# Altium PCB PCB.PcbDoc (part 3 of 3)
Units mm, origin at the board's own origin, x right, y up, seen from the top; angles counter-clockwise.
Board outline 35.13 x 75.01 mm, 4 copper layers (Top Layer, GND_Signal_1, Signal_1, Bottom Layer), stack 1.707 mm thick; 130 components, 99 nets, 648 pads, 871 vias.
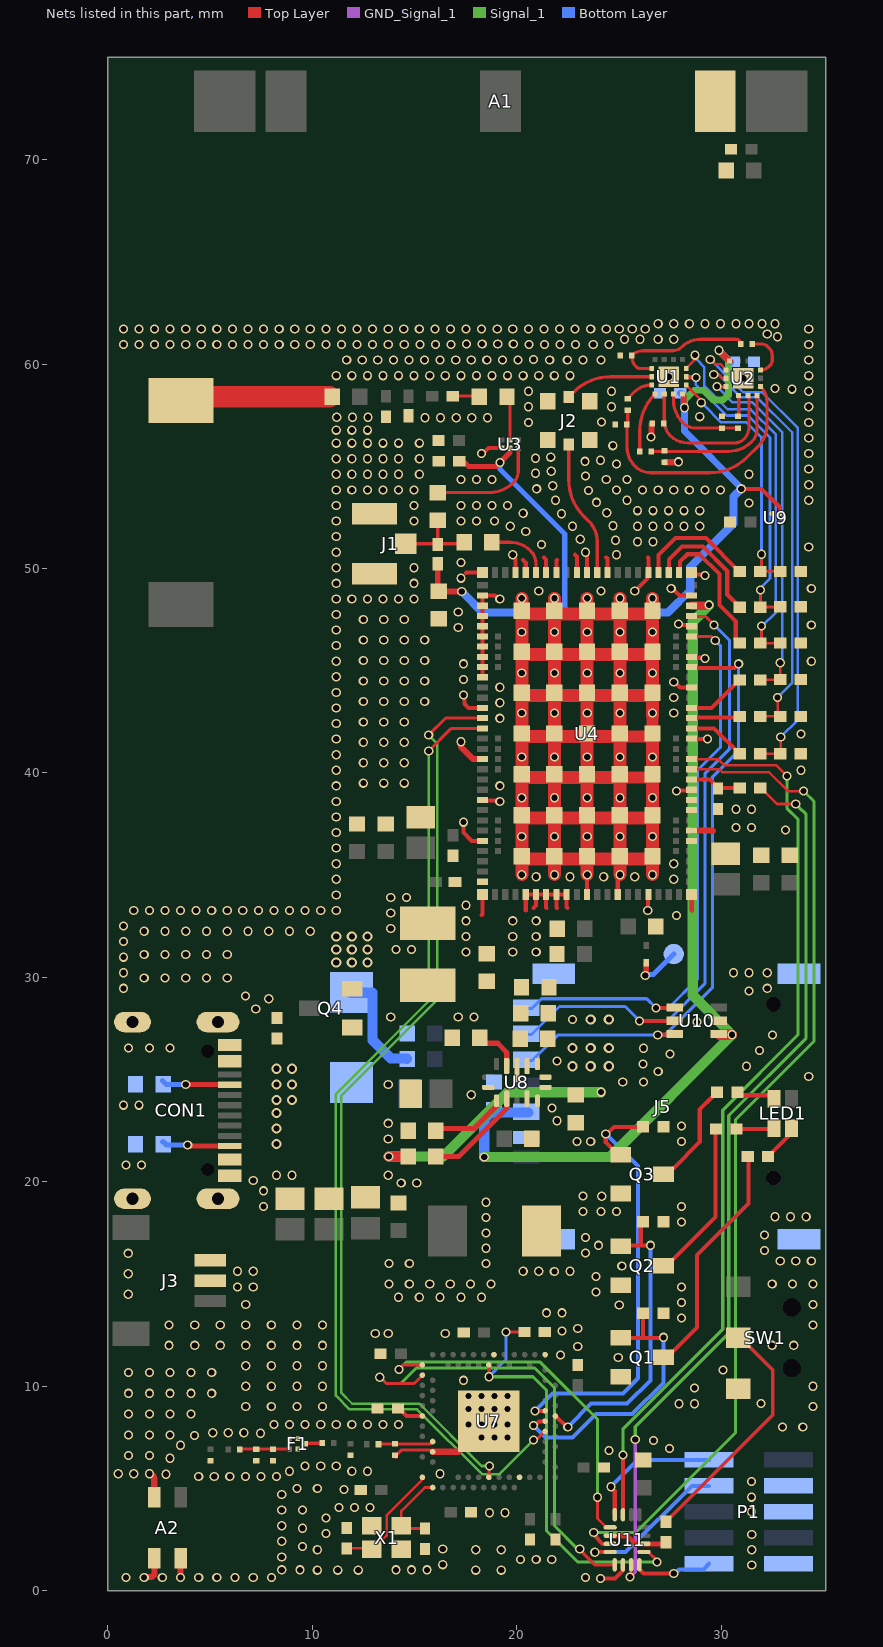
[diagram p4: the nets of this part, all layers, seen from the top]

## Via types
v1: diameter 0.45, hole 0.3, Top Layer to Bottom Layer, tented both sides, 821 vias
v2: diameter 0.5, hole 0.3, Top Layer to Bottom Layer, tented both sides, 26 vias
v3: diameter 0.45, hole 0.3, Top Layer to Bottom Layer, 24 vias

## Nets (pads, with @x,y where several pads share a name; then routed paths per layer and width w, separated by ;. In a path a pad name is that pad's centre, name@x,y a point inside that pad or via, vN(x,y) a via of type N, cw(c..) or ccw(c..) an arc to the next point about the centre after c; other vN are vias at no path point) (continued)
GND: A2.2 C5.2 C6.2 C7.2 C9.2 C10.1 C11.1 C14.2 C15.2 C16.2 C17.2 C18.2 C19.2 C20.2 C21.2 C22.2 C23.2 C26.2 C27.2 C28.2 C29.2 C30.2 C31.2 C32.2 C33.1 C34.1 C35.1 C36.1 C37.2 C38.2 C40.2 C41.2 C42.2 C44.1 C45.2 C46.2 C48.1 C49.1 C50.1 C51.1 C52.1 C53.1 C57.1 C58.1 C59.1 C60.2 CON1.A1 CON1.A12 CON1.B1 CON1.B12 CON1.S1 CON1.S2 CON1.S3 CON1.S4 CR1.1 F1.2 F1.3 F1.5 J1.2 J2.2 J3.1 J3.2 J5.C5 J5.S1 J5.S2 J5.S3 J5.S4 L2.1 L3.1 L4.1 L5.1 L8.1 P1.3 P1.5 P1.9 Q1.2 Q2.2 Q3.2 R3.1 R7.1 R8.1 R9.1 R14.1 R15.1 R16.1 R22.1 R23.1 R24.1 R26.1 R29.1 R30.1 R31.1 R32.2 R33.2 R34.1 SW1.1 U1.15 U2.15 U3.1 U3.4 U4.1 U4.5 U4.6 U4.7 U4.8 U4.9 U4.11 U4.14 U4.17 U4.21 U4.27 U4.31 U4.36 U4.41 U4.44 U4.47 U4.50 U4.52 U4.56 U4.60 U4.62 U4.63 U4.65 U4.66 U4.68 U4.69 U4.72 U4.74 U4.75 U4.76 U4.77 U4.78 U4.79 U4.80 U4.81 U4.82 U4.85 U4.90 U4.94 U4.98 U4.103 U7.74 U7.AD2 U7.B7 U7.F23 U8.1 U8.7 U8.12 U8.14 U9.B1 U10.2 U11.6 X1.2 X1.4 | length 161.4
  Top Layer w0.145: C33.1@14.087,6.513 14.087,6.594 14.38,6.887 U7.F23@15.797,6.887
  Top Layer w0.146: U7.F23@15.797,6.887 U7.F23@15.891,6.793 ; C60.2@26.162,6.415 C60.2@26.187,6.39
  Top Layer w0.2: A2.2@2.269,4.576 A2.2@2.284,4.576 ; v1(17.399,37.592) 17.399,37.084 17.803,36.68 U4.98@18.324,36.68 ; v1(17.399,43.815) 17.447,43.767 17.447,43.386 17.653,43.18 U4.85@18.324,43.18 ; 17.526,49.784 17.542,49.8 U4.72@18.324,49.8 ; 18.288,33.045 18.324,33.082 U4.1@18.324,34.06 ; v1(18.288,55.626) 18.356,55.626 18.617,55.887 U3.1@19.276,55.887 ; U4.94@18.324,38.68 18.36,38.644 19.141,38.644 v1(19.177,38.608) ; U4.82@18.324,44.68 U4.76@18.324,47.68 U4.75@18.324,48.18 U4.74@18.324,48.68 18.944,48.68 19.109,48.514 v1(19.177,48.514) ; v1(19.812,50.673) 19.812,50.605 19.944,50.473 U4.69@19.944,49.8 ; 20.32,50.419 20.444,50.295 U4.68@20.444,49.8 ; 20.447,33.274 20.444,33.277 U4.5@20.444,34.06 U4.6@20.944,34.06 ; 20.828,33.401 20.944,33.517 U4.6@20.944,34.06 ; 21.336,50.546 21.444,50.438 U4.66@21.444,49.8 ; 21.463,33.401 21.444,33.42 U4.7@21.444,34.06 ; U4.65@21.944,49.8 21.944,50.392 21.971,50.419 ; 21.971,33.401 21.944,33.428 U4.8@21.944,34.06 ; 22.479,33.401 22.444,33.436 U4.9@22.444,34.06 U4.8@21.944,34.06 ; 22.86,50.673 22.944,50.589 U4.63@22.944,49.8 ; v1(23.368,50.8) 23.444,50.724 U4.62@23.444,49.8 ; U4.11@23.444,34.06 23.448,34.064 23.448,35.019 v1(23.452,35.023) ; v1(24.105,0.589) 24.814,0.589 25.2,0.975 U11.6@25.2,1.264 ; 24.384,50.546 24.444,50.486 U4.60@24.444,49.8 ; U4.14@24.944,34.06 24.944,34.848 25.052,34.956 v1(25.052,35.023) ; v1(25.781,48.895) 26.394,49.508 26.394,49.75 U4.56@26.444,49.8 26.444,50.518 26.416,50.546 ; v1(26.416,33.274) 26.43,33.288 26.43,34.046 U4.17@26.444,34.06 ; v1(27.559,49.022) 27.617,49.022 27.959,48.68 U4.50@28.564,48.68 ; v1(27.686,44.45) 27.724,44.45 27.994,44.18 U4.41@28.564,44.18 ; v1(27.813,39.116) 27.845,39.148 28.532,39.148 U4.31@28.564,39.18 ; v1(27.913,47.28) 27.981,47.28 28.031,47.23 28.514,47.23 U4.47@28.564,47.18 ; U4.21@28.564,34.06 28.564,33.285 28.575,33.274 ; U4.36@28.564,41.68 28.576,41.668 29.325,41.668 v1(29.337,41.656) ; U4.44@28.564,45.68 28.608,45.636 29.167,45.636 v1(29.21,45.593) ; U4.52@28.564,49.8 28.659,49.705 29.162,49.705 v1(29.21,49.657) ; U4.6@20.944,34.06 U4.7@21.444,34.06 ; U4.7@21.444,34.06 U4.8@21.944,34.06
  Top Layer w0.3: v1(1.778,0.635) 1.807,0.664 2.139,0.664 2.286,0.811 2.286,1.559 A2.2@2.269,1.576 ; v1(2.032,5.715) cw(c2.032,5.478) 2.269,5.478 A2.2@2.269,4.576 ; v1(3.556,0.635) 3.556,1.576 A2.2@3.569,1.576 ; U7.F23@15.891,6.793 17.141,6.793 U7.74@18.641,8.293 ; v1(17.272,41.529) 17.272,41.275 17.867,40.68 U4.90@18.324,40.68 ; v1(26.568,56.439) 26.597,56.467 26.597,57.071 C7.2@26.63,57.103 ; L4.1@27.229,55.189 27.24,55.2 27.895,55.2 v1(27.915,55.22) ; U4.27@28.564,37.18 29.579,37.18 29.591,37.168
  Top Layer w0.508: U4.103@20.217,39.785 U4.103@20.252,39.785 ; U4.103@20.252,37.785 U4.103@20.252,37.903
  Top Layer w0.584: U4.103@25.052,39.785 U4.103@26.652,39.785 ; U4.103@25.052,41.785 U4.103@26.652,41.785
  Top Layer w0.597: U4.103@26.652,41.785 v1@26.652,42.785
  Top Layer w0.635: v1(20.252,35.023) U4.103@20.252,35.785 ; v1(20.252,48.547) U4.103@20.252,47.785 ; v1(21.852,35.023) U4.103@21.852,35.785 ; v1(21.852,48.547) U4.103@21.852,47.785 ; v1(23.452,35.023) U4.103@23.452,35.785 ; v1(23.452,48.547) U4.103@23.452,47.785 ; v1(25.052,35.023) U4.103@25.052,35.785 ; v1(25.052,48.547) U4.103@25.052,47.785 ; v1(26.652,35.023) U4.103@26.652,35.785 ; U4.103@26.652,41.785 26.652,39.785 U4.103@26.652,37.785 ; v1@26.652,42.785 U4.103@26.652,43.785 ; v1(26.652,48.547) U4.103@26.652,47.785 ; U4.103@20.252,35.785 U4.103@21.852,35.785 ; U4.103@20.252,35.785 U4.103@20.252,37.785 ; U4.103@20.252,37.785 U4.103@20.252,39.785 ; U4.103@20.252,37.785 U4.103@21.852,37.785 ; U4.103@20.252,39.785 v1(20.252,40.785) U4.103@20.252,41.785 ; U4.103@20.252,39.785 U4.103@21.852,39.785 ; U4.103@20.252,41.785 U4.103@20.252,43.785 ; U4.103@20.252,41.785 U4.103@21.852,41.785 ; U4.103@20.252,43.785 U4.103@20.252,45.785 ; U4.103@20.252,43.785 U4.103@21.852,43.785 ; U4.103@20.252,45.785 U4.103@20.252,47.785 ; U4.103@20.252,45.785 U4.103@21.852,45.785 ; U4.103@20.252,47.785 U4.103@21.852,47.785 ; U4.103@21.852,35.785 U4.103@23.452,35.785 ; U4.103@21.852,35.785 U4.103@21.852,37.785 ; U4.103@21.852,37.785 U4.103@23.452,37.785 ; U4.103@21.852,37.785 v1(21.852,38.785) U4.103@21.852,39.785 ; U4.103@21.852,39.785 v1(21.852,40.785) U4.103@21.852,41.785 ; U4.103@21.852,39.785 U4.103@23.452,39.785 ; U4.103@21.852,41.785 U4.103@23.452,41.785 ; U4.103@21.852,41.785 U4.103@21.852,43.785 ; U4.103@21.852,43.785 U4.103@21.852,45.785 ; U4.103@21.852,43.785 U4.103@23.452,43.785 ; U4.103@21.852,45.785 U4.103@23.452,45.785 ; U4.103@21.852,45.785 U4.103@21.852,47.785 ; U4.103@21.852,47.785 U4.103@23.452,47.785 ; U4.103@23.452,35.785 U4.103@25.052,35.785 ; U4.103@23.452,35.785 U4.103@23.452,37.785 ; U4.103@23.452,37.785 U4.103@23.452,39.785 ; U4.103@23.452,37.785 U4.103@25.052,37.785 ; U4.103@23.452,39.785 v1(23.452,40.785) U4.103@23.452,41.785 ; U4.103@23.452,39.785 U4.103@25.052,39.785 ; U4.103@23.452,41.785 U4.103@23.452,43.785 ; U4.103@23.452,41.785 U4.103@25.052,41.785 ; U4.103@23.452,43.785 U4.103@23.452,45.785 ; U4.103@23.452,43.785 U4.103@25.052,43.785 ; U4.103@23.452,45.785 U4.103@23.452,47.785 ; U4.103@23.452,45.785 U4.103@25.052,45.785 ; U4.103@23.452,47.785 U4.103@25.052,47.785 ; U4.103@25.052,35.785 U4.103@26.652,35.785 ; U4.103@25.052,35.785 U4.103@25.052,37.785 ; U4.103@25.052,37.785 U4.103@25.052,39.785 ; U4.103@25.052,37.785 U4.103@26.652,37.785 ; U4.103@25.052,39.785 v1(25.052,40.785) U4.103@25.052,41.785 ; U4.103@25.052,41.785 U4.103@25.052,43.785 ; U4.103@25.052,43.785 U4.103@25.052,45.785 ; U4.103@25.052,43.785 U4.103@26.652,43.785 ; U4.103@25.052,45.785 U4.103@25.052,47.785 ; U4.103@25.052,45.785 U4.103@26.652,45.785 ; U4.103@25.052,47.785 U4.103@26.652,47.785 ; U4.103@26.652,35.785 U4.103@26.652,37.785 ; U4.103@26.652,43.785 U4.103@26.652,45.785 ; U4.103@26.652,45.785 U4.103@26.652,47.785
  other v1: 0.889,0.635 2.667,0.635 4.445,0.635 5.334,0.635 6.223,0.635 7.112,0.635 8.001,0.635 23.368,0.635 8.509,1.016 9.398,1.016 10.25,1 11.25,1 12.25,1 14.097,1.016 14.859,1.016 15.621,1.016 18,1 19.25,1 16.383,1.27 31.5,1.25 20.193,1.524 20.955,1.524 21.717,1.524 8.509,1.651 10.25,2 18,2 19.25,2 31.5,2 16.383,2.032 9.525,2.159 8.509,2.413 31.5,2.75 10.668,2.794 9.525,3.048 8.509,3.175 10.668,3.556 18.669,3.81 19.431,3.81 31.494,3.855 8.509,3.937 9.525,3.937 11.303,4.064 12.065,4.064 12.827,4.064 31.496,4.572 8.509,4.699 11.557,4.953 9.25,5 10.25,5 31.496,5.334 4.445,5.588 5.207,5.588 5.969,5.588 6.731,5.588 7.493,5.588 8.255,5.588 2.845,5.69 0.508,5.715 1.27,5.715 16.256,5.715 8.89,5.842 11.938,5.842 12.7,5.842 9.652,6.096 10.414,6.096 11.176,6.096 3.048,6.477 1.016,6.604 2.032,6.604 24.511,6.858 27.483,6.96 3.556,7.112 26.695,7.341 4.242,7.595 1.016,7.62 2.032,7.62 3.048,7.62 7.468,7.696 5.131,7.722 5.893,7.722 6.655,7.722 33,8 34,8 8.128,8.128 8.89,8.128 9.652,8.128 10.414,8.128 11.176,8.128 11.938,8.128 12.7,8.128 13.462,8.128 14.224,8.128 1.016,8.636 2.032,8.636 3.048,8.636 4.064,8.636 6.75,9 8,9 9.25,9 10.5,9 34.5,9 27.94,9.144 28.702,9.144 31.953,9.153 1.016,9.652 2.032,9.652 3.048,9.652 4.064,9.652 5.08,9.652 28.702,9.906 6.75,10 8,10 9.25,10 10.5,10 34.5,10 17.399,10.287 1.016,10.668 2.032,10.668 3.048,10.668 4.064,10.668 5.08,10.668 30.099,10.795 6.75,11 8,11 9.25,11 10.5,11 24.97,11.41 22.141,11.527 22.987,11.938 3,12 4.25,12 5.5,12 6.75,12 8,12 9.25,12 10.5,12 32.5,12 33.554,12 13.081,12.573 13.716,12.573 16.51,12.573 22.225,12.7 22.987,12.827 3,13 4.25,13 5.5,13 6.75,13 8,13 9.25,13 10.5,13 34.5,13 28.067,13.335 21.463,13.589 22.225,13.589 25.019,13.97 6.75,14 34.5,14 28.067,14.097 14.224,14.351 15.24,14.351 16.256,14.351 17.272,14.351 18.288,14.351 1,14.5 23.876,14.605 6.35,14.859 7.112,14.859 28.067,14.859 13.75,15 14.75,15 15.75,15 16.75,15 17.75,15 18.75,15 32.5,15 33.5,15 34.5,15 23.876,15.367 1,15.5 6.35,15.621 7.112,15.621 20.32,15.621 21.082,15.621 21.844,15.617 22.606,15.621 25.146,15.875 13.75,16 14.75,16 18.5,16 32.893,16.129 33.655,16.129 34.417,16.129 1,16.5 23.368,16.51 32.131,16.637 18.5,16.75 24.003,16.891 23.368,17.272 32.131,17.399 18.5,17.5 28.067,18.034 18.5,18.25 32.639,18.288 33.401,18.288 34.163,18.288 23.241,18.542 24.13,18.542 24.892,18.542 7.62,18.796 28.067,18.796 18.5,19 23.241,19.304 24.166,19.292 7.62,19.558 14.351,19.939 15.113,19.939 7.112,20.066 8.255,20.32 9.017,20.32 13.716,20.32 0.889,20.828 1.651,20.828 22.956,21.971 23.622,21.971 28.067,21.971 13.716,22.098 28.067,22.733 13.716,22.86 21.971,22.987 21.736,23.61 0.762,23.749 1.524,23.749 17.78,24.257 13.716,24.765 25.19,24.88 26.206,24.88 34.29,25.146 26.924,25.4 31.242,25.654 26.179,25.762 21.971,25.908 27.5,26.25 31.877,26.416 1.016,26.543 2.032,26.543 3.048,26.543 26.206,26.531 32.512,27.178 28.829,27.813 22.733,27.94 13.843,28.067 17.145,28.067 17.907,28.067 7.239,28.448 7.874,28.956 6.731,29.083 31.369,29.337 0.762,29.464 32.258,29.464 1.778,29.972 2.794,29.972 3.81,29.972 4.826,29.972 5.842,29.972 0.762,30.226 30.607,30.226 31.369,30.226 32.258,30.226 0.762,30.988 1.778,31.115 2.794,31.115 3.81,31.115 4.826,31.115 5.842,31.115 17.526,31.242 19.812,31.242 20.955,31.242 14.097,31.369 14.859,31.369 0.762,31.75 17.526,32.004 19.812,32.004 20.955,32.004 1.778,32.258 2.794,32.258 3.81,32.258 4.826,32.258 5.842,32.258 6.858,32.258 7.874,32.258 8.89,32.258 9.906,32.258 13.843,32.385 0.762,32.512 17.526,32.766 19.812,32.766 20.955,32.766 27.813,33.02 13.843,33.147 1.27,33.274 2.032,33.274 2.794,33.274 3.556,33.274 4.318,33.274 5.08,33.274 5.842,33.274 6.604,33.274 7.366,33.274 8.128,33.274 8.89,33.274 9.652,33.274 10.414,33.274 11.176,33.274 17.526,33.528 13.843,33.909 14.605,33.909 11.176,34.036 11.176,34.798 27.686,34.798 20.955,34.925 22.606,34.925 24.257,34.925 25.781,34.925 11.176,35.56 27.686,35.56 11.176,36.322 20.252,36.897 21.852,36.897 23.452,36.897 25.052,36.897 26.652,36.897 11.176,37.084 33.147,37.211 30.734,37.338 31.496,37.338 11.176,37.846 30.734,38.227 31.496,38.227 11.176,38.608 20.252,38.785 23.452,38.785 25.052,38.785 26.652,38.785 11.176,39.37 19.177,39.37 12.5,39.5 13.5,39.5 14.5,39.5 11.176,40.132 33.909,40.132 12.5,40.5 13.5,40.5 14.5,40.5 26.652,40.785 11.176,40.894 12.5,41.5 13.5,41.5 14.5,41.5 11.176,41.656 33.909,41.91 11.176,42.418 12.5,42.5 13.5,42.5 14.5,42.5 19.177,42.672 27.686,42.926 20.252,42.934 21.852,42.934 23.452,42.934 25.052,42.934 26.652,42.934 11.176,43.18 19.177,43.434 12.5,43.5 13.5,43.5 14.5,43.5 15.5,43.5 27.686,43.688 11.176,43.942 19.177,44.196 12.5,44.5 13.5,44.5 14.5,44.5 15.5,44.5 17.399,44.577 11.176,44.704 20.252,44.89 21.852,44.89 23.452,44.89 25.052,44.89 26.652,44.89 17.399,45.339 11.176,45.466 34.417,45.466 12.5,45.5 13.5,45.5 14.5,45.5 15.5,45.5 11.176,46.228 12.5,46.5 13.5,46.5 14.5,46.5 15.5,46.5 20.252,46.903 21.852,46.903 23.452,46.903 25.052,46.903 26.652,46.903 11.176,46.99 17.145,47.117 34.417,47.244 12.5,47.5 13.5,47.5 14.5,47.5 11.176,47.752 17.145,47.879 11.176,48.514 11.938,48.514 12.7,48.514 13.462,48.514 14.224,48.514 14.986,48.514 21.082,48.895 24.13,48.895 34.417,49.022 11.176,49.276 14.986,49.276 17.272,49.53 11.176,50.038 14.986,50.038 17.272,50.292 24.892,50.673 11.176,50.8 34.29,51.054 21.209,51.181 25.908,51.308 26.67,51.308 24.841,51.384 23.114,51.435 11.176,51.562 20.447,51.816 19.685,52.07 22.733,52.07 25.908,52.07 26.67,52.07 27.432,52.07 28.194,52.07 28.956,52.07 24.714,52.095 11.176,52.324 14.986,52.324 17.272,52.324 18.034,52.324 18.923,52.324 22.2,52.68 20.32,52.705 24.409,52.73 25.908,52.832 26.67,52.832 27.432,52.832 28.194,52.832 28.956,52.832 11.176,53.086 14.986,53.086 17.272,53.086 18.034,53.086 18.796,53.086 19.558,53.086 31.369,53.213 23.901,53.238 21.895,53.34 25.4,53.34 34.29,53.34 23.52,53.823 11.176,53.848 11.938,53.848 12.7,53.848 13.462,53.848 14.224,53.848 14.986,53.848 24.892,53.848 26.162,53.848 26.924,53.848 27.686,53.848 28.448,53.848 29.21,53.848 29.972,53.848 20.98,53.899 21.768,54.051 34.29,54.102 17.272,54.356 18.034,54.356 18.796,54.356 24.384,54.356 25.4,54.356 23.368,54.534 11.176,54.61 11.938,54.61 12.7,54.61 13.462,54.61 14.224,54.61 15.24,54.61 31.369,54.61 20.93,54.661 21.692,54.762 34.29,54.864 24.892,55.118 23.343,55.245 24.105,55.296 11.176,55.372 11.938,55.372 12.7,55.372 13.462,55.372 14.224,55.372 15.24,55.372 20.93,55.397 21.666,55.448 34.29,55.626 24.705,56.011 11.176,56.134 11.938,56.134 12.7,56.134 13.462,56.134 14.224,56.134 15.24,56.134 34.29,56.388 11.176,56.769 11.938,56.769 12.7,56.769 20.574,57.15 34.29,57.15 24.155,57.175 15.519,57.379 16.281,57.379 17.043,57.379 17.805,57.379 18.567,57.379 11.201,57.404 11.963,57.404 12.725,57.404 28.956,57.429 20.574,57.912 24.638,57.912 34.29,57.912 20.574,58.674 24.638,58.674 34.29,58.674 33.477,58.776 32.639,58.801 31.087,59.311 27.448,59.38 11.176,59.436 11.938,59.436 12.7,59.436 13.462,59.436 14.224,59.436 14.986,59.436 15.748,59.436 16.51,59.436 17.272,59.436 18.034,59.436 18.796,59.436 19.558,59.436 20.32,59.436 21.082,59.436 21.844,59.436 22.606,59.436 34.29,59.436 11.684,60.198 12.446,60.198 13.208,60.198 13.97,60.198 14.732,60.198 15.494,60.198 16.256,60.198 17.018,60.198 17.78,60.198 18.542,60.198 19.304,60.198 20.066,60.198 21.615,60.198 22.479,60.198 23.241,60.198 24.13,60.198 34.29,60.198 20.828,60.223 0.762,60.96 1.524,60.96 2.286,60.96 3.048,60.96 3.81,60.96 4.572,60.96 5.334,60.96 6.096,60.96 6.858,60.96 7.62,60.96 8.382,60.96 9.144,60.96 9.906,60.96 10.668,60.96 11.43,60.96 12.192,60.96 12.954,60.96 13.716,60.96 14.503,60.96 15.265,60.96 16.027,60.96 16.789,60.96 20.599,60.96 21.361,60.96 22.123,60.96 22.885,60.96 23.749,60.96 24.511,60.96 34.29,60.96 17.551,60.985 18.313,60.985 19.075,60.985 19.837,60.985 25.273,61.214 26.035,61.214 26.924,61.214 27.686,61.214 32.766,61.341 32.258,61.468 0.762,61.722 1.524,61.722 2.286,61.722 3.048,61.722 3.81,61.722 4.572,61.722 5.334,61.722 6.096,61.722 6.858,61.722 7.62,61.722 8.382,61.722 9.144,61.722 9.906,61.722 10.668,61.722 11.43,61.722 12.192,61.722 12.954,61.722 13.716,61.722 14.478,61.722 15.24,61.722 16.002,61.722 16.764,61.722 17.526,61.722 18.288,61.722 19.05,61.722 19.812,61.722 20.574,61.722 21.336,61.722 22.098,61.722 22.86,61.722 23.622,61.722 24.384,61.722 25.019,61.722 25.654,61.722 26.289,61.722 34.29,61.722 26.924,61.976 27.686,61.976 28.448,61.976 29.21,61.976 29.972,61.976 30.734,61.976 31.369,61.976 32.004,61.976 32.639,61.976
  other v2: 22.733,25.654 23.622,25.654 24.511,25.654 22.733,26.543 23.622,26.543 24.511,26.543 23.622,27.94 24.511,27.94
  other v3: 18.288,7.493 18.923,7.493 19.558,7.493 17.653,8.128 18.288,8.128 18.923,8.128 19.558,8.128 17.653,8.89 18.288,8.89 18.923,8.89 19.558,8.89 17.653,9.525 18.288,9.525 18.923,9.525 19.558,9.525
GPS_LNA_IN: L6.1 U3.5 | length 2.2
  Top Layer w0.156: L6.1@19.527,58.408 cw(c19.167,58.049) 19.676,58.049 U3.5@19.676,56.287
GPS_RF1: C13.2 U3.3 | length 5.6
  Top Layer w0.156: C13.2@16.145,53.714 18.621,53.714 ccw(c18.621,55.471) 19.863,54.229 ccw(c19.349,54.743) 20.076,54.743 U3.3@20.076,55.887
GPS_RF2: C12.2 C13.1 J1.1 L9.2 | length 4
  Top Layer w0.156: J1.1@14.571,51.211 L9.2@16.145,51.211 ; L9.2@16.145,51.178 L9.2@16.145,51.211 ; C13.1@16.145,52.364 L9.2@16.145,51.211 ; C12.2@17.426,51.211 L9.2@16.145,51.211
GPS_RF3: C12.1 U4.67 | length 3.1
  Top Layer w0.156: C12.1@18.785,51.283 19.694,51.283 cw(c19.694,49.895) 20.676,50.876 cw(c20.027,50.228) 20.944,50.228 U4.67@20.944,49.8
ILIM: R31.2 U8.4 | length 2.3
  Top Layer w0.254: R31.2@18.201,27.051 18.478,26.774 19.073,26.774 19.515,26.332 U8.4@19.515,25.667
LTE_RF: J2.3 U1.13 | length 4
  Top Layer w0.156: J2.3@22.788,58.637 cw(c24.584,56.84) 24.584,59.38 U1.13@26.603,59.38
LTE_RF1: J2.1 U4.61 | length 6.7
  Top Layer w0.156: J2.1@22.547,56.075 22.547,54.35 ccw(c25.087,54.35) 23.291,52.554 23.546,52.299 cw(c22.584,51.337) 23.944,51.337 U4.61@23.944,49.8
NetA1_2: A1.2 C1.2 L1.2
NetANT1_1: ANT1.1 L7.1 | length 7.3
  Top Layer w1.041: ANT1.1@3.581,58.231 3.759,58.408 L7.1@10.85,58.408
NetC8_1: C8.1 L6.2 | length 1.2
  Top Layer w0.156: C8.1@16.87,58.434 L6.2@18.115,58.434
NetC23_1: C23.1 R13.2 U4.32 | length 2.6
  Top Layer w0.2: U4.32@28.564,39.68 29.45,39.68 29.845,39.285 C23.1@29.845,39.235 29.878,39.268 30.916,39.268 30.92,39.272 R13.2@30.945,39.272
NetC35_2: C35.2 CR1.2 F1.4 R18.1 | length 2.5
  Top Layer w0.156: R18.1@6.457,6.909 6.457,6.934 F1.4@8.842,6.934 ; F1.4@8.846,6.938 F1.4@8.842,6.934 ; F1.4@8.892,6.934 F1.4@8.842,6.934
NetC37_1: C37.1 U7.N24 | length 1.4
  Top Layer w0.2: C37.1@14.355,9.055 14.355,8.801 14.613,8.543 U7.N24@15.391,8.543
NetC44_2: C44.2 C45.1 C46.1 C48.2 C49.2 D2.2 Q4.2 R25.2 U8.3 | length 5.4
  Bottom Layer w0.5: D2.2@11.913,29.251 12.954,29.251 12.954,26.924 13.843,26.035 14.641,26.035 R25.2@14.641,26.01
  other v2: 11.176,30.734 11.938,30.734 12.7,30.734 11.176,31.369 11.938,31.369 12.7,31.369 11.176,32.004 11.938,32.004 12.7,32.004
NetCON1_A5: CON1.A5 R32.1 | length 3.4
  Top Layer w0.25: v1(3.81,24.765) 3.82,24.755 5.944,24.755 CON1.A5@5.954,24.745
  Bottom Layer w0.25: R32.1@2.682,24.943 2.859,24.765 v1(3.81,24.765)
NetCON1_B5: CON1.B5 R33.1 | length 3.4
  Top Layer w0.25: v1(3.907,21.802) 3.963,21.745 CON1.B5@5.954,21.745
  Bottom Layer w0.25: R33.1@2.682,21.946 2.707,21.971 2.876,21.802 v1(3.907,21.802)
NetD1_1: D1.1 TP1.1 | length 2.5
  Top Layer w0.254: v1(26.289,30.099) 26.289,30.152 26.338,30.201 26.338,30.718 D1.1@26.34,30.72
  Bottom Layer w0.254: v1(26.289,30.099) 26.327,30.137 26.682,30.137 TP1.1@27.686,31.14
NetF1_1: F1.1 L12.2 | length 0.9
  Top Layer w0.156: F1.1@9.646,7.163 9.646,7.187 9.673,7.214 L12.2@10.485,7.214
NetFB1_2: FB1.2 R2.2 U4.102
NetLED1_1: LED1.1 R20.2 | length 1.9
  Top Layer w0.2: R20.2@32.301,21.234 33.445,22.379 LED1.1@33.445,22.618
NetLED1_2: LED1.2 R19.2 | length 1.9
  Top Layer w0.2: R19.2@30.751,22.581 32.558,22.581 LED1.2@32.595,22.618
NetLED1_3: LED1.3 R21.2 | length 1.9
  Top Layer w0.2: R21.2@30.802,24.384 30.827,24.384 30.98,24.232 32.431,24.232 LED1.3@32.595,24.068
NetQ1_3: Q1.3 R20.1 | length 12
  Top Layer w0.2: Q1.3@27.19,11.41 27.317,11.41 27.598,11.691 27.643,11.691 28.829,12.878 28.829,16.408 31.349,18.929 31.349,21.059 31.101,21.059 31.276,21.234 R20.1@31.301,21.234
NetQ2_3: Q2.3 R19.1 | length 7.9
  Top Layer w0.2: Q2.3@27.19,15.896 27.317,15.896 27.598,16.177 27.632,16.177 29.726,18.271 29.726,22.581 R19.1@29.751,22.581
NetQ3_3: Q3.3 R21.1 | length 5.2
  Top Layer w0.2: Q3.3@27.19,20.377 27.317,20.377 27.598,20.658 27.668,20.658 28.956,21.946 28.956,23.538 29.602,24.184 29.602,24.209 29.777,24.384 R21.1@29.802,24.384
NetR4_2: R4.2 U4.55 | length 5.9
  Top Layer w0.2: U4.55@26.944,49.8 26.944,50.668 27.762,51.486 29.261,51.486 30.886,49.86 R4.2@30.92,49.86
NetR5_2: R5.2 U4.54 | length 6.3
  Top Layer w0.2: U4.54@27.444,49.8 27.444,50.431 28.092,51.079 29.108,51.079 30.302,49.886 30.302,48.725 R5.2@30.92,48.108
NetR6_2: R6.2 U4.53 | length 6.8
  Top Layer w0.2: U4.53@27.944,49.8 27.994,49.85 27.994,50.346 28.346,50.698 28.956,50.698 29.914,49.74 29.914,48.22 30.72,47.414 30.72,46.53 30.895,46.355 R6.2@30.92,46.355
NetR13_1: R13.1 U11.7 | length 44.4
  Top Layer w0.125: R13.1@31.92,39.268 31.953,39.268 32.741,38.481 v1(33.655,38.481)
  Top Layer w0.152: v1(25.552,0.66) 25.587,0.695 25.587,1.251 U11.7@25.6,1.264
  GND_Signal_1 w0.152: v1(25.552,0.66) 25.801,0.909 v1(25.801,7.386)
  Signal_1 w0.152: v1(25.801,7.386) 25.801,8.021 30.378,12.598 30.378,23.241 34.163,27.026 34.163,37.973 33.782,38.354 33.782,38.481 v1(33.655,38.481)
NetR35_1: R35.1 SW1.2 | length 11.9
  Top Layer w0.178: R35.1@27.305,3.37 32.537,8.603 32.537,10.786 30.952,12.371 SW1.2@30.852,12.371
NetR35_2: R35.2 U11.2 U11.10 | length 2.9
  Top Layer w0.25: U11.2@24.575,2.689 24.579,2.685 25.407,2.685 25.803,2.289 U11.10@26.225,2.289 26.228,2.286 27.145,2.286 R35.2@27.28,2.421
NetU4_33: U4.33 U11.3 | length 49.2
  Top Layer w0.125: U4.33@28.564,40.18 29.924,40.18 30.068,40.036 32.354,40.036 33.274,39.116 v1(34.036,39.116)
  Top Layer w0.2: v1(23.774,2.845) 23.774,2.718 24.205,2.288 U11.3@24.575,2.289 U11.3@24.575,2.289
  Signal_1 w0.152: v1(23.774,2.845) 25.832,2.845 30.709,7.722 30.709,23.038 34.544,26.873 34.544,38.608 v1(34.036,39.116)
NetU4_34: U4.34 U11.15 | length 44.9
  Top Layer w0.125: U4.34@28.564,40.68 29.855,40.68 30.149,40.386 32.69,40.386 v1(33.22,39.856)
  Top Layer w0.2: v1(25.198,6.629) 25.198,3.716 U11.15@25.2,3.714
  Signal_1 w0.152: v1(25.198,6.629) 25.198,7.901 30.082,12.785 30.082,23.504 33.764,27.185 33.764,37.737 33.22,38.281 v1(33.22,39.856)
nRF52_ANT: C33.2 L13.1 U7.H23 | length 2.7
  Top Layer w0.156: L13.1@13.239,7.177 15.774,7.177 U7.H23@15.891,7.293
nRF52_RST: C41.1 U7.AC13 U11.9 | length 21
  Top Layer w0.152: U7.AC13@18.641,11.043 18.642,11.042 18.642,10.466 v1(18.644,10.465) ; v1(19.482,12.649) C41.1@20.379,12.649 ; U11.9@26.225,1.889 26.44,1.889 26.797,1.532 v1@26.797,1.397 ; v1@26.797,1.372 26.848,1.372 v1(26.873,1.397)
  Signal_1 w0.152: v1(18.644,10.465) 20.803,10.465 21.463,9.804 21.463,2.921 22.987,1.397 v1(26.873,1.397)
  Bottom Layer w0.152: v1(18.644,10.465) 19.482,11.303 v1(19.482,12.649)
nRF52_SWDCLK: U7.AA24 U11.5 | length 22.3
  Top Layer w0.152: v1(13.301,10.439) 13.606,10.135 14.983,10.135 U7.AA24@15.391,10.543 ; v1@23.038,2.045 23.819,1.264 U11.5@24.8,1.264
  Signal_1 w0.152: v1(13.301,10.439) 13.332,10.439 13.637,10.135 14.326,10.135 15.082,10.891 20.881,10.891 21.852,9.919 21.852,3.167 22.918,2.101 v1@23.089,2.101
  other v1: 23.089,2.032
nRF52_SWDIO: U7.AC24 U11.1 | length 17.9
  Top Layer w0.152: v1(14.249,10.82) 14.275,10.795 14.275,10.846 14.472,11.043 U7.AC24@15.391,11.043 ; v1(23.952,4.565) 23.952,3.531 24.394,3.089 U11.1@24.575,3.089
  Signal_1 w0.152: v1(14.249,10.82) 14.605,11.176 21.158,11.176 23.952,8.382 v1(23.952,4.565)
P0.16/AIN3: U4.26
P0.17: U7.AD12
P0.18/AIN5: U4.29
P0.19/AIN6: U4.30
P0.21: R10.2 U4.37 | length 2.9
  Top Layer w0.2: U4.37@28.564,42.18 29.66,42.18 30.895,40.945 R10.2@30.92,40.945
P0.22: R11.2 U4.38 | length 2.4
  Top Layer w0.2: U4.38@28.564,42.68 28.607,42.723 30.877,42.723 R11.2@30.92,42.766
P0.23: R12.2 U4.39 | length 2.9
  Top Layer w0.2: U4.39@28.564,43.18 29.531,43.18 30.895,44.544 R12.2@30.92,44.544
PGOOD: R28.1 U8.9 | length 4.9
  Top Layer w0.254: R28.1@16.042,21.234 17.17,21.234 19.515,23.579 U8.9@19.515,24.067
REF: C58.2 U8.8 | length 3.7
  Top Layer w0.254: C58.2@16.042,22.504 16.144,22.606 17.907,22.606 19.015,23.714 U8.8@19.015,23.967
RESET: P1.10 U11.8 | length 3.9
  Top Layer w0.2: U11.8@26,1.264 26,1.055 26.216,0.838 v1(27.686,0.838)
  Bottom Layer w0.2: v1(27.686,0.838) 27.754,0.838 27.956,1.04 29.131,1.04 P1.10@29.406,1.315
RF2_SW1: R12.1 R16.2 U2.7 | length 17.7
  Top Layer w0.127: v1(29.794,58.903) 29.813,58.883 30.215,58.883 U2.7@30.242,58.911 ; R12.1@31.92,44.544 31.945,44.57 R16.2@32.901,44.57 32.893,44.578 v1(32.893,45.39)
  Bottom Layer w0.127: v1(29.794,58.903) 30.566,58.131 31.531,58.131 32.997,56.665 32.997,45.494 v1(32.893,45.39)
RF2_SW2: R11.1 R15.2 U2.6 | length 20.9
  Top Layer w0.127: v1(29.642,59.487) 29.87,59.487 30.047,59.311 U2.6@30.242,59.311 ; R11.1@31.92,42.766 R15.2@32.901,42.766 32.766,42.901 v1(32.766,43.688)
  Bottom Layer w0.127: v1(29.642,59.487) 29.869,59.487 30.978,58.378 31.767,58.378 33.477,56.667 33.477,44.399 v1(32.766,43.688)
RF2_SW3: R10.1 R14.2 U2.5 | length 23.7
  Top Layer w0.127: v1@29.624,60.104 29.732,59.996 29.967,59.996 30.242,59.721 U2.5@30.242,59.711 ; R10.1@31.92,40.945 R14.2@32.901,40.945 32.918,40.962 v1(32.918,41.758)
  Bottom Layer w0.127: v1(29.469,60.223) 29.49,60.223 30.055,59.658 30.055,59.651 31.082,58.625 32.002,58.625 33.757,56.871 33.757,42.596 v1(32.918,41.758)
RF_SW1: R6.1 R7.2 U1.7 | length 18.6
  Top Layer w0.127: U1.7@28.293,59.78 28.293,59.79 28.723,60.22 v1(28.723,60.438) ; v1@31.987,47.269 31.979,47.261 v1(31.979,47.183) 31.979,46.414 R6.1@31.92,46.355 R7.2@32.901,46.355
  Bottom Layer w0.127: v1(28.723,60.438) 28.787,60.374 28.787,60.24 29.183,59.844 29.183,58.93 30.327,57.785 31.445,57.785 32.682,56.549 32.682,47.85 32.014,47.183 v1(31.979,47.183)
RF_SW2: R5.1 R8.2 U1.6 | length 15
  Top Layer w0.127: R5.1@31.92,48.108 R5.1@31.928,48.115 ; v1(31.928,48.946) R5.1@31.928,48.115 ; R8.2@32.901,48.133 32.888,48.12 31.933,48.12 R5.1@31.928,48.115
  Top Layer w0.2: U1.6@28.293,59.38 28.293,59.375 28.308,59.36 28.748,59.36 v1(28.769,59.339)
  Bottom Layer w0.127: v1(28.769,59.339) 28.769,58.988 30.27,57.487 31.312,57.487 32.392,56.406 32.392,49.512 31.928,49.047 v1(31.928,48.946)
RF_SW3: R4.1 R9.2 U1.5 | length 12.4
  Top Layer w0.127: U1.5@28.293,58.98 28.293,58.97 29.058,58.206 29.032,58.181 v1(29.032,58.115) ; v1(31.979,50.698) 31.979,49.919 R4.1@31.92,49.86 R9.2@32.901,49.86
  Bottom Layer w0.127: v1(29.032,58.115) 29.032,58.039 29.058,58.014 29.134,58.014 29.993,57.154 31.238,57.154 31.979,56.413 v1(31.979,50.698)
RXD: U4.86 U7.B13 | length 46.6
  Top Layer w0.15: v1(15.697,41.862) 15.7,41.862 16.518,42.68 U4.86@18.324,42.68 ; U7.B13@18.641,5.543 18.655,5.557 18.655,6.082 v1(18.669,6.096)
  Signal_1 w0.125: v1(15.697,41.862) 16.111,41.447 16.111,28.898 11.426,24.213 11.426,9.672 11.958,9.14 15.244,9.14 18.288,6.096 v1(18.669,6.096)
SIM_1V8: C59.2 J5.C1 U4.49 U10.1 | length 42.5
  Top Layer w0.4: U4.49@28.564,48.18 29.377,48.18 v1(29.41,48.213)
  Top Layer w0.5: U10.1@29.925,27.19 v1(30.537,27.19)
  Signal_1 w0.5: v1(18.415,21.209) 24.556,21.209 v1(30.537,27.19) 28.61,29.117 28.61,47.406 29.41,48.206 v1(29.41,48.213)
  Bottom Layer w0.5: v1(18.415,21.209) 18.415,23.054 18.69,23.329 18.69,23.354 18.865,23.529 C59.2@18.89,23.529 ; C59.2@18.872,23.383 18.877,23.387 20.566,23.387 J5.C1@20.57,23.392
SIM_CLK: J5.C3 U4.46 U10.4 | length 28.6
  Top Layer w0.15: U4.46@28.564,46.68 29.52,46.68 v1(29.718,46.482)
  Top Layer w0.2: v1(26.816,28.503) 27.711,28.503 U10.4@27.737,28.529
  Bottom Layer w0.152: J5.C3@20.57,28.472 20.731,28.472 21.214,28.956 26.362,28.956 v1(26.816,28.503) 27.426,28.503 28.834,29.911 28.834,40.119 29.972,41.257 29.972,46.228 v1(29.718,46.482)
SIM_IO: J5.C7 U4.48 U10.5 | length 31.6
  Top Layer w0.15: U4.48@28.564,47.68 28.592,47.652 29.246,47.652 v1(29.654,47.245)
  Top Layer w0.2: v1(26.017,27.869) 26.019,27.871 27.729,27.871 U10.5@27.737,27.879
  Bottom Layer w0.152: J5.C7@20.57,27.202 20.724,27.202 22.097,28.575 25.31,28.575 v1(26.017,27.869) 27.386,27.869 29.21,29.692 29.21,39.968 30.421,41.178 30.421,46.478 v1(29.654,47.245)
SIM_RST: J5.C2 U4.43 U10.6 | length 30.1
  Top Layer w0.2: v1(26.903,27.174) 26.933,27.203 27.711,27.203 U10.6@27.737,27.229 ; U4.43@28.564,45.18 28.601,45.143 30.665,45.143 v1(30.861,45.339)
  Bottom Layer w0.152: J5.C2@20.57,25.932 20.768,25.932 22.01,27.174 v1(26.903,27.174) 27.253,27.174 29.591,29.512 29.591,39.817 30.861,41.087 v1(30.861,45.339)
STAT_RGB_B: Q3.1 R24.2 U7.P2 | length 22.2
  Top Layer w0.2: v1(20.902,8.791) 21.389,8.791 U7.P2@21.391,8.793 ; Q3.1@25.217,21.327 Q3.1@25.09,21.327 24.963,21.327 24.36,21.93 v1(24.36,22.34) 24.407,22.34 24.755,22.688 25.982,22.688 R24.2@26.07,22.6
  Bottom Layer w0.2: v1(20.902,8.791) 21.764,9.652 25.197,9.652 25.933,10.389 25.933,20.767 v1(24.36,22.34)
STAT_RGB_G: Q2.1 R23.2 U7.N1 | length 15.1
  Top Layer w0.2: U7.N1@21.891,8.543 21.911,8.543 22.453,8.001 v1(22.504,8.001) ; Q2.1@25.09,16.846 25.136,16.891 26.07,16.891 ; R23.2@26.182,18.04 26.07,17.927 26.07,16.891 ; v1(26.543,16.891) 26.07,16.891
  Bottom Layer w0.2: v1(22.504,8.001) 23.647,9.144 25.4,9.144 26.543,10.287 v1(26.543,16.891)
STAT_RGB_R: Q1.1 R22.2 U7.M2 | length 13.9
  Top Layer w0.2: v1(20.828,8.077) 20.896,8.077 21.097,8.279 21.377,8.279 U7.M2@21.391,8.293 ; Q1.1@25.09,12.36 26.189,12.36 ; R22.2@26.182,13.569 26.182,12.367 26.189,12.36 ; v1(27.178,12.391) 27.147,12.36 26.189,12.36
  Bottom Layer w0.2: v1(20.828,8.077) 21.412,7.493 22.733,7.493 23.876,8.636 25.654,8.636 27.178,10.16 v1(27.178,12.391)
SW: C43.2 L15.1 U8.2 U8.11
SWDCLK: P1.4 U11.4 | length 7.7
  Top Layer w0.2: v1(23.825,1.88) 24.565,1.88 U11.4@24.575,1.889
  Bottom Layer w0.2: v1(23.825,1.88) 25.335,1.88 28.581,5.125 P1.4@29.406,5.125
SWDIO: P1.2 U11.16 | length 6.8
  Top Layer w0.2: v1(24.613,5.084) 24.613,5.063 24.8,4.876 U11.16@24.8,3.714
  Bottom Layer w0.2: v1(24.613,5.084) 25.924,6.395 P1.2@29.406,6.395
T1A: L5.2 R1.1 U2.12 | length 12.5
  Top Layer w0.156: R1.1@25.436,57.748 25.436,57.149 cw(c25.3,57.149) L5.2@25.396,57.053 25.396,55.962 ccw(c26.763,55.962) 25.797,54.996 ccw(c26.534,55.733) 26.534,54.69 29.469,54.69 ccw(c29.469,57.23) 31.266,55.434 31.817,55.986 ccw(c30.775,57.028) 32.249,57.028 32.249,58.146 ccw(c31.168,58.146) U2.12@31.932,58.911
T1F: R1.2 U1.14 | length 1.4
  Top Layer w0.156: R1.2@25.436,58.318 25.742,58.624 cw(c26.603,57.763) U1.14@26.603,58.98
T2A: C3.1 L4.2 U2.11 | length 7.4
  Top Layer w0.156: C3.1@26.59,55.732 30.347,55.732 ccw(c30.347,57.38) 31.512,56.214 ccw(c30.909,56.818) 31.762,56.818 U2.11@31.762,58.466
T2F: C3.2 U1.1 | length 3
  Top Layer w0.156: C3.2@26.02,55.732 26.02,56.73 cw(c28.56,56.73) 26.764,58.526 U1.1@26.773,58.535
T3F: C7.1 U1.2 U2.10 | length 8.1
  Top Layer w0.156: U1.2@27.223,58.535 27.223,57.221 ccw(c28.252,57.221) 27.524,56.494 ccw(c28.364,57.334) 28.364,56.146 30.659,56.146 ccw(c30.659,56.813) 31.131,56.341 ccw(c30.579,56.893) 31.36,56.893 31.36,58.351 ccw(c31.197,58.351) U2.10@31.312,58.466
T4A: C2.1 U2.9 | length 1
  Top Layer w0.156: C2.1@30.826,57.439 ccw(c30.74,57.526) 30.862,57.526 U2.9@30.862,58.466
T4F: C2.2 L2.2 U1.3 | length 4.3
  Top Layer w0.156: U1.3@27.673,58.535 27.673,58.241 ccw(c29.246,58.241) 28.134,57.129 ccw(c28.761,57.756) 28.761,56.869 C2.2@30.826,56.869
T5A: C4.1 U2.14 | length 2.3
  Top Layer w0.156: C4.1@31.533,60.985 31.979,60.985 cw(c31.979,60.556) 32.282,60.86 32.36,60.782 cw(c32.007,60.43) 32.506,60.43 32.506,60.198 cw(c32.152,60.198) 32.402,59.948 32.328,59.875 cw(c31.932,60.271) U2.14@31.932,59.711
T5F: C4.2 L3.2 U1.12 | length 7.2
  Top Layer w0.156: L3.2@25.627,60.405 ccw(c26.381,60.405) 25.846,59.874 ccw(c25.95,59.976) 25.848,59.872 ccw(c26.069,60.093) 26.069,59.78 U1.12@26.603,59.78 ; L3.2@25.704,60.499 25.689,60.499 25.627,60.437 L3.2@25.627,60.422 cw(c26.191,59.858) 26.191,60.655 27.638,60.655 ccw(c27.638,61.262) 28.067,60.833 cw(c28.987,59.913) 28.987,61.214 30.734,61.214 cw(c30.734,60.985) C4.2@30.963,60.985
TXD: U4.87 U7.K2 | length 49.2
  Top Layer w0.15: v1(15.699,41.074) 16.805,42.18 U4.87@18.324,42.18 ; v1(20.828,7.366) 20.885,7.423 21.021,7.423 U7.K2@21.391,7.793
  Signal_1 w0.125: v1(15.699,41.074) 15.699,28.832 11.157,24.289 11.157,9.544 11.83,8.871 15.132,8.871 18.32,5.683 19.145,5.683 v1(20.828,7.366)
VBUS: CON1.A4 CON1.A9 CON1.B4 CON1.B9 D2.1 Q4.1 R29.2
  other v2: 8.255,21.844 8.255,22.606 8.255,23.368 8.255,24.003 9.017,24.003 8.255,24.765 9.017,24.765 8.255,25.527 9.017,25.527
VCC: C57.2 R28.2 U8.13 | length 12.6
  Top Layer w0.5: v1(13.741,21.234) R28.2@14.692,21.234
  Signal_1 w0.5: v1(13.741,21.234) 16.408,21.234 19.558,24.384 v1(24.13,24.384)
VDD_RF_FE: C5.1 C6.1 C10.2 C11.2 L9.1 U1.4 U2.4 U3.2 U9.A1 | length 48.3
  Top Layer w0.2: v1(30.988,53.899) 31.975,53.899 32.874,52.999 U9.A1@32.874,52.692
  Top Layer w0.254: L9.1@16.145,50.228 16.145,48.939 C10.2@16.196,48.888 ; C11.2@17.188,55.245 17.404,55.245 17.658,54.991 18.986,54.991 v1(19.187,55.192) 19.676,55.681 U3.2@19.676,55.887 ; v1@28.173,57.903 U1.4@28.173,58.435
  Top Layer w0.3: C10.2@16.196,48.888 16.203,48.881 17.306,48.881 v1(17.314,48.874)
  Top Layer w0.33: v1(29.896,60.681) 29.896,60.672 U2.4@30.412,60.156
  Signal_1 w0.33: v1(28.21,57.865) 28.21,58.233 28.702,58.725 29.151,58.725 29.634,58.242 30.099,58.242 30.358,58.502 30.358,60.185 29.896,60.648 v1(29.896,60.681)
  Bottom Layer w0.254: v1(19.187,55.192) 19.187,54.854 22.352,51.689 22.352,47.854
  Bottom Layer w0.33: C5.1@28.008,58.572 28.058,58.572 28.173,58.458 28.173,57.935 28.21,57.898 v1(28.21,57.865) 28.21,56.727 30.988,53.95 v1(30.988,53.899) ; v1(29.896,60.681) 30.463,60.114 C6.1@30.463,60.071
  Bottom Layer w0.4: v1(17.314,48.874) 18.334,47.854 22.352,47.854 27.407,47.854 28.492,48.939 28.492,50.082 30.607,52.197 30.607,53.518 v1(30.988,53.899)
XC1: C28.1 U7.B24 X1.1 | length 5.9
  Top Layer w0.125: C28.1@11.684,2.065 12.865,2.065 X1.1@12.915,2.016 12.965,2.016 13.64,2.691 13.64,3.683 15.346,5.389 15.346,5.588 U7.B24@15.391,5.543
XC2: C27.1 U7.A23 X1.3 | length 3.9
  Top Layer w0.125: C27.1@15.519,3.04 14.491,3.04 X1.3@14.365,3.166 14.365,3.9 15.508,5.043 U7.A23@15.891,5.043
pads on no net: A1.0 A1.3 A1.4 ANT1.2 CON1. CON1.A6 CON1.A7 CON1.A8 CON1.B6 CON1.B7 CON1.B8 J3.0 J5. J5.C6 P1.6 P1.7 P1.8 SW1. SW1.3 U1. U1.8 U1.9 U1.10 U1.11 U2. U2.1 U2.2 U2.3 U2.8 U4.2 U4.3 U4.10 U4.15 U4.16 U4.18 U4.19 U4.20 U4.23 U4.24 U4.25 U4.28 U4.35 U4.40 U4.42 U4.51 U4.57 U4.58 U4.59 U4.64 U4.70 U4.71 U4.73 U4.83 U4.84 U4.88 U4.89 U4.95 U4.96 U4.97 U4.99 U4.100 U4.104 U4.105 U4.106 U4.107 U4.108 U4.109 U4.110 U4.111 U4.112 U4.113 U4.114 U4.115 U4.116 U4.117 U4.118 U4.119 U4.120 U4.121 U4.122 U4.123 U4.124 U4.125 U4.126 U4.127 U7.A8 U7.A10 U7.A12 U7.A14 U7.A16 U7.A18 U7.A20 U7.AB2 U7.AC5 U7.AC9 U7.AC11 U7.AC15 U7.AC17 U7.AC19 U7.AC21 U7.AD4 U7.AD6 U7.AD8 U7.AD10 U7.AD16 U7.AD18 U7.AD20 U7.AD22 U7.B3 U7.B9 U7.B11 U7.B15 U7.B17 U7.B19 U7.D2 U7.F2 U7.G1 U7.H2 U7.J1 U7.J24 U7.L1 U7.L24 U7.R1 U7.R24 U7.T2 U7.T23 U7.U1 U7.V23 U7.W24 U11.11 U11.12 U11.13
copper on no net:
  other v1: 29.718,9.22 29.718,9.982

## Polygon pours and split planes (outlines as drawn)
GND on GND_Signal_1 "Top Layer-GND" (solid, pour order 20): 35.128,62.357 35.128,0 0,0 0,62.357
GND on Top Layer "Top Layer-GND" (solid, pour order 22): 35.128,62.357 35.128,0 0,0 0,62.357
GND on Signal_1 "Top Layer-GND" (solid, pour order 24): 35.128,62.357 35.128,0 0,0 0,62.357
GND on Bottom Layer "Top Layer-GND" (solid, pour order 26): 35.128,62.357 35.128,0 0,0 0,62.357

## Keep-outs
Keep-Out Layer:
  region: 0.254,33.807 10.617,33.807 10.617,60.3 10.643,60.325 0.178,60.325 0.204,33.803

## Other copper
Top Layer:
  region net +3V3: 23.749,34.417 24.13,34.417 24.13,28.702 22.946,28.702 22.946,32.852 23.749,33.655
  pour cut-out: 0.2,1.095 0.2,5.032 7.847,5.032 7.847,1.095
  region net +BATT: 10.516,27.971 8.921,27.971 8.89,27.94 8.89,29.845 6.731,29.845 6.731,31.496 10.363,31.496 10.516,31.344
  region net +BATT: 5.779,14.464 5.765,14.478 3.302,14.478 3.302,16.637 1.905,16.637 1.905,13.716 5.969,13.716 5.969,14.478 5.955,14.464
  pour cut-out: 13.208,5.489 15.55,5.489 15.55,6.633 14.75,6.633 14.75,7.679 13.208,7.679
  region net +3V3: 17.78,18.923 15.494,18.923 14.859,18.288 7.747,18.288 7.747,13.843 10.668,13.843 10.668,17.018 14.859,17.018 16.002,15.875 17.78,15.875
  region net +3V3: 31.953,33.858 31.953,31.877 33.764,31.877 33.764,35.128 29.312,35.128 29.023,34.84 28.228,34.84 28.219,34.849 28.219,34.493 28.905,34.493 29.54,33.858
  region net +3V3: 11.792,36.678 15.565,36.678 16.129,36.114 16.129,35.255 16.408,34.976 16.408,34.214 15.596,34.214 14.58,35.23 13.335,35.23 13.335,33.147 11.792,33.147
  region net NetFB1_2: 16.637,35.179 16.332,35.484 16.332,36.373 17.755,36.373 17.755,34.95 17.831,34.874 18.594,34.874 18.594,34.493 17.856,34.493 17.526,34.163 16.637,34.163
  region net VCC: 21.152,24.742 21.175,24.765 24.511,24.765 24.511,23.819 22.4,23.819 21.709,24.51 21.134,24.51 21.134,24.723
  region net SW: 20.32,26.162 20.673,26.162 20.673,23.539 21.844,22.368 22.479,21.733 22.479,16.129 19.05,16.129 19.05,20.554 20.32,21.824
  region net NetC44_2: 19.812,24.816 19.812,28.067 19.15,28.729 10.883,28.729 10.863,28.709 10.795,28.777 10.795,32.334 13.335,32.334 13.335,31.293 14.148,30.48 20.068,30.48 20.853,29.694 20.853,26.806 20.168,26.2 20.168,24.816
  region net VBUS: 12.125,23.47 13.081,24.425 13.081,27.965 11.176,27.965 10.592,27.381 7.95,27.381 6.76,26.191 5.379,26.199 5.379,25.578 6.655,25.578 7.239,24.994 7.239,21.641 7.036,21.438 5.359,21.438 5.359,20.726 8.026,20.726 8.992,21.692 8.992,23.47
  pour cut-out: 11.408,58.784 20.142,58.784 20.142,57.963 11.408,57.963
GND_Signal_1:
  region net +3V3: 7.747,16.129 10.668,16.129 10.668,13.843 7.747,13.843 7.747,16.065
  region net +BATT: 6.731,29.845 6.731,31.496 8.89,31.496 8.89,29.845
  region net +BATT: 1.905,16.637 3.302,16.637 3.302,13.716 1.905,13.716 1.905,16.637
  pour cut-out: 0.227,1.095 0.227,5.032 7.974,5.032 7.974,1.095
  pour cut-out: 15.208,50.559 11.683,50.559 11.683,51.884 15.208,51.884
Signal_1:
  pour cut-out: 0.2,1.095 0.2,5.032 7.847,5.032 7.847,1.095
  pour cut-out: 19.498,56.11 19.498,56.491 19.874,56.491 19.874,56.11
  pour cut-out: 19.879,55.703 19.879,56.084 20.255,56.084 20.255,55.703
  pour cut-out: 15.667,47.038 15.667,54.22 16.751,54.22 16.751,47.038
  pour cut-out: 14.046,51.783 19.355,51.783 19.355,50.698 14.046,50.698
  pour cut-out: 11.408,59.043 20.142,59.043 20.142,57.773 11.408,57.773
  pour cut-out: 31.871,60.667 30.671,60.667 30.671,61.267 31.871,61.267
  pour cut-out: 30.542,56.521 30.542,57.721 31.142,57.721 31.142,56.521
  pour cut-out: 29.755,56.521 29.755,57.721 30.355,57.721 30.355,56.521
  pour cut-out: 26.883,54.874 26.883,56.074 27.483,56.074 27.483,54.874
  pour cut-out: 25.686,56.046 26.886,56.046 26.886,55.446 25.686,55.446
  pour cut-out: 26.295,57.393 27.495,57.393 27.495,56.793 26.295,56.793
  pour cut-out: 24.562,57.418 25.717,57.418 25.717,56.769 24.562,56.769
  pour cut-out: 25.77,58.617 25.77,57.417 25.17,57.417 25.17,58.617
  pour cut-out: 25.978,60.108 24.778,60.108 24.778,60.708 25.978,60.708
Bottom Layer:
  region net +3V3: 7.747,16.129 10.668,16.129 10.668,13.843 7.747,13.843 7.747,16.065
  pour cut-out: 0.2,1.095 0.2,5.032 7.974,5.032 7.974,1.095
  region net NetC44_2: 10.865,28.254 10.795,28.319 10.795,32.309 13.31,32.309 13.31,28.254
  region net VBUS: 13.106,25.908 7.722,25.908 7.722,21.463 8.966,21.463 8.966,23.495 13.106,23.495

## Silkscreen, mask and mechanical layers (free items; w line width, h text height)
Bottom Paste:
  drawing of 537 lines, arcs and shapes, not listed
  text "Layer" at 56.121,313.431 h1.52
  text "Name" at 66.533,313.431 h1.52
  text "Material" at 90.149,313.431 h1.52
  text "Thickness" at 111.987,313.431 h1.52
  text "Constant" at 128.493,313.431 h1.52
  text "Board Layer Stack" at 142.967,313.431 h1.52
  text "Top Overlay" at 66.533,310.383 h1.52
  text "Top Solder" at 66.533,307.335 h1.52
  text "Solder Resist" at 90.149,307.335 h1.52
  text "1.87mil" at 111.987,307.335 h1.52
  text "3.5" at 128.493,307.335 h1.52
  text "1" at 56.121,304.287 h1.52
  text "Top Layer" at 66.533,304.287 h1.52
  text "Copper" at 90.149,304.287 h1.52
  text "0.71mil" at 111.987,304.287 h1.52
  text "Dielectric 3" at 66.533,301.239 h1.52
  text "3.94mil" at 111.987,301.239 h1.52
  text "4.2" at 128.493,301.239 h1.52
  text "2" at 56.121,298.191 h1.52
  text "GND_Signal_1" at 66.533,298.191 h1.52
  text "Copper" at 90.149,298.191 h1.52
  text "0.60mil" at 111.987,298.191 h1.52
  text "Dielectric1" at 66.533,295.143 h1.52
  text "FR-4" at 90.149,295.143 h1.52
  text "12.60mil" at 111.987,295.143 h1.52
  text "4.8" at 128.493,295.143 h1.52
  text "3" at 56.121,292.095 h1.52
  text "Signal_1" at 66.533,292.095 h1.52
  text "Copper" at 90.149,292.095 h1.52
  text "1.40mil" at 111.987,292.095 h1.52
  text "Dielectric 1" at 66.533,289.047 h1.52
  text "PP-006" at 90.149,289.047 h1.52
  text "47.24mil" at 111.987,289.047 h1.52
  text "4.1" at 128.493,289.047 h1.52
  text "4" at 56.121,285.999 h1.52
  text "Bottom Layer" at 66.533,285.999 h1.52
  text "Copper" at 90.149,285.999 h1.52
  text "0.71mil" at 111.987,285.999 h1.52
  text "Bottom Solder" at 66.533,282.951 h1.52
  text "Solder Resist" at 90.149,282.951 h1.52
  text "1.87mil" at 111.987,282.951 h1.52
  text "3.5" at 128.493,282.951 h1.52
  text "Bottom Overlay" at 66.533,279.903 h1.52
Mechanical 1 (Mech29):
  lines w0.254: 0,0 0,18.771 0,28.473 0,75.006 35.128,75.006 35.128,0 0,0

## Dimensions
0,0 to 0,75.006 on Via Capping Top
0,0 to 35.128,0 on Via Capping Top

## Text inside footprints (layer, text, board x,y; h text height)
D2: Bottom Overlay "+" at 12.09,23.038 h1
LED1: Top Overlay "+" at 34.366,24.384 h1 r180